# Altium PCB PCB1.PcbDoc
Units mil, origin at the board's own origin, x right, y up, seen from the top; angles counter-clockwise.
Board outline 1505 x 2235 mil, 4 copper layers (Top Layer, In1_GND, In2_GND, Bottom Layer), stack 23.756 mil thick; 69 components, 42 nets, 218 pads, 84 vias.
Unrouted connection lines stored in the file: 3.
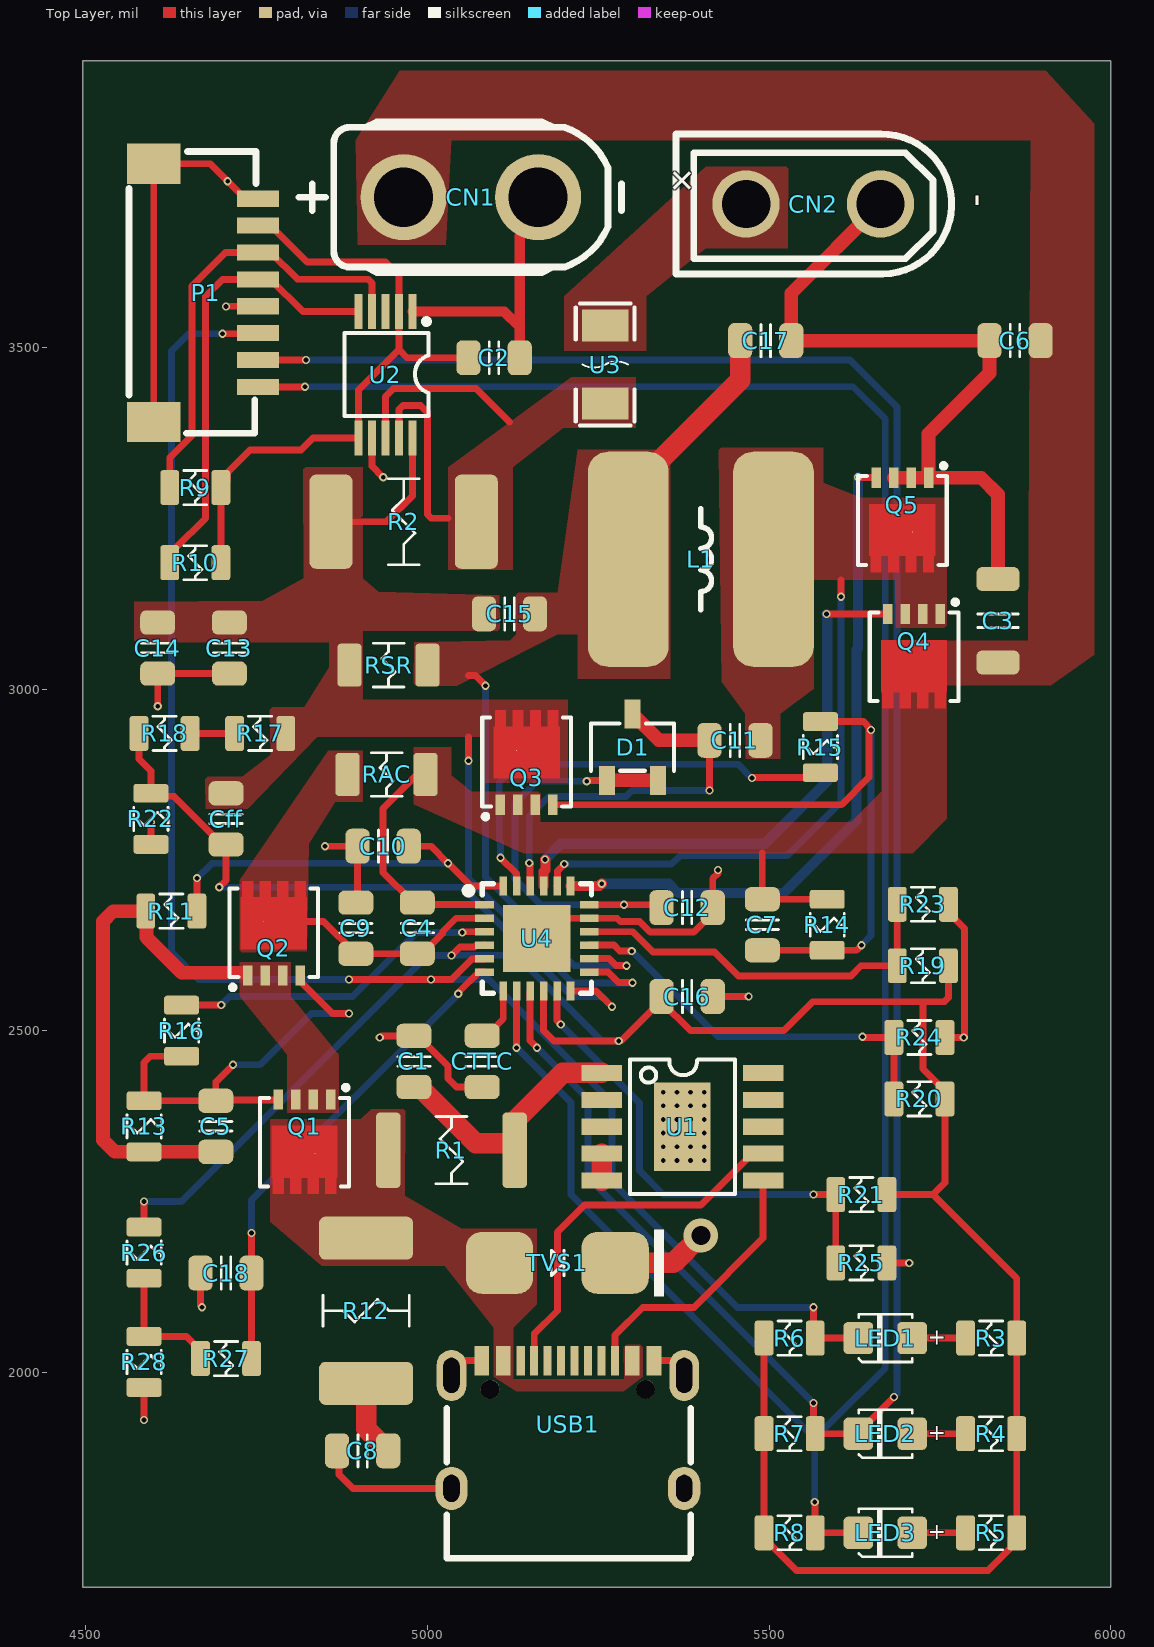
[diagram p0: Top Layer view]
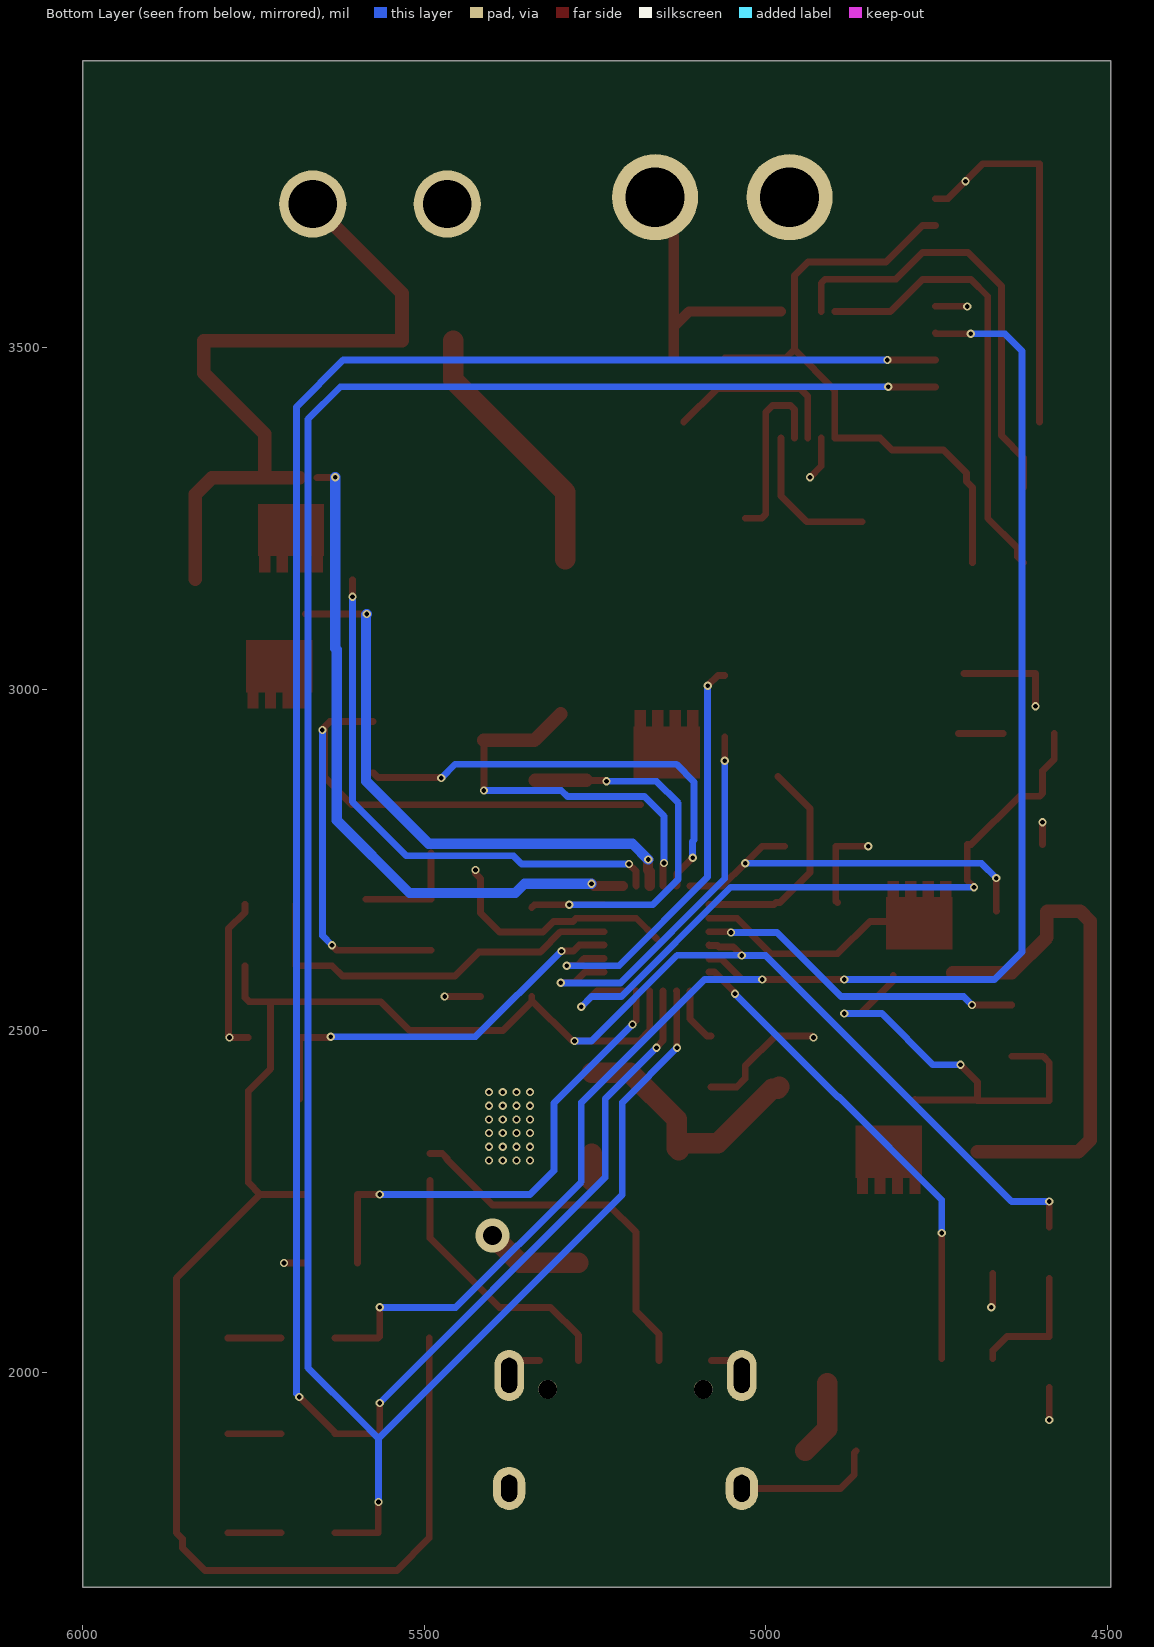
[diagram p1: Bottom Layer view, seen from below]
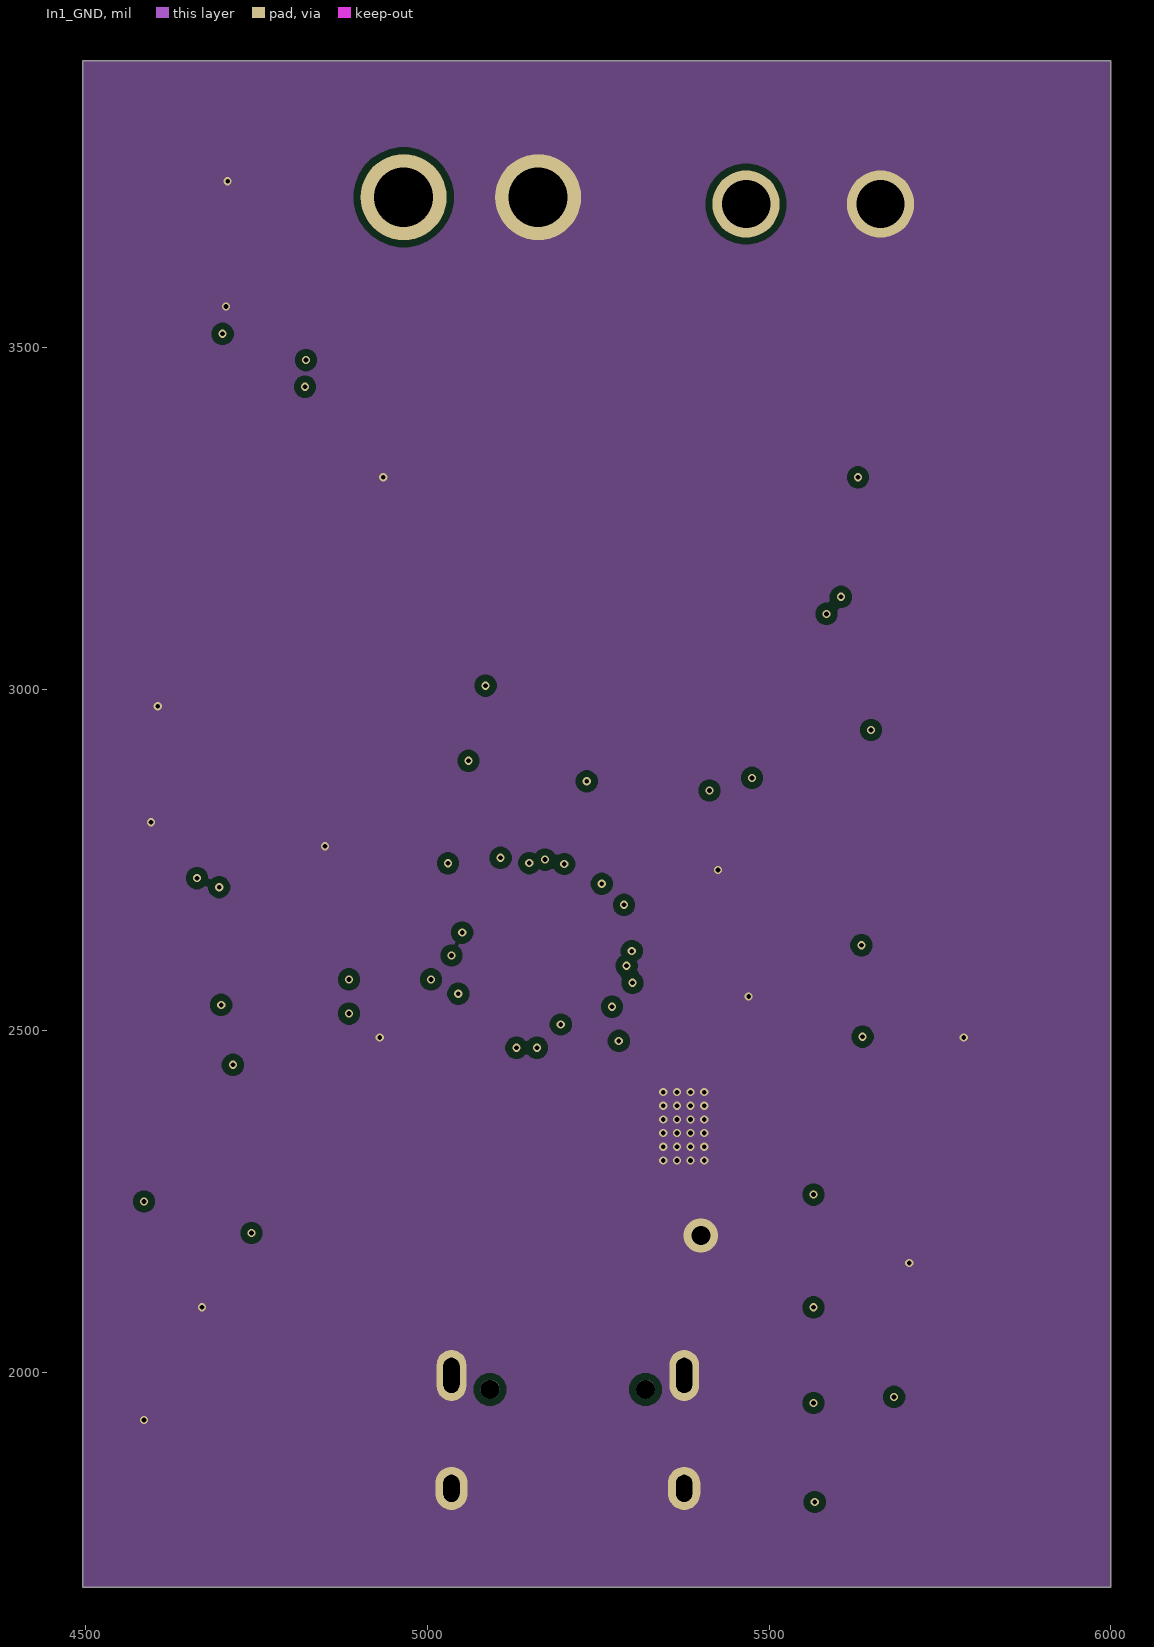
[diagram p2: In1_GND]
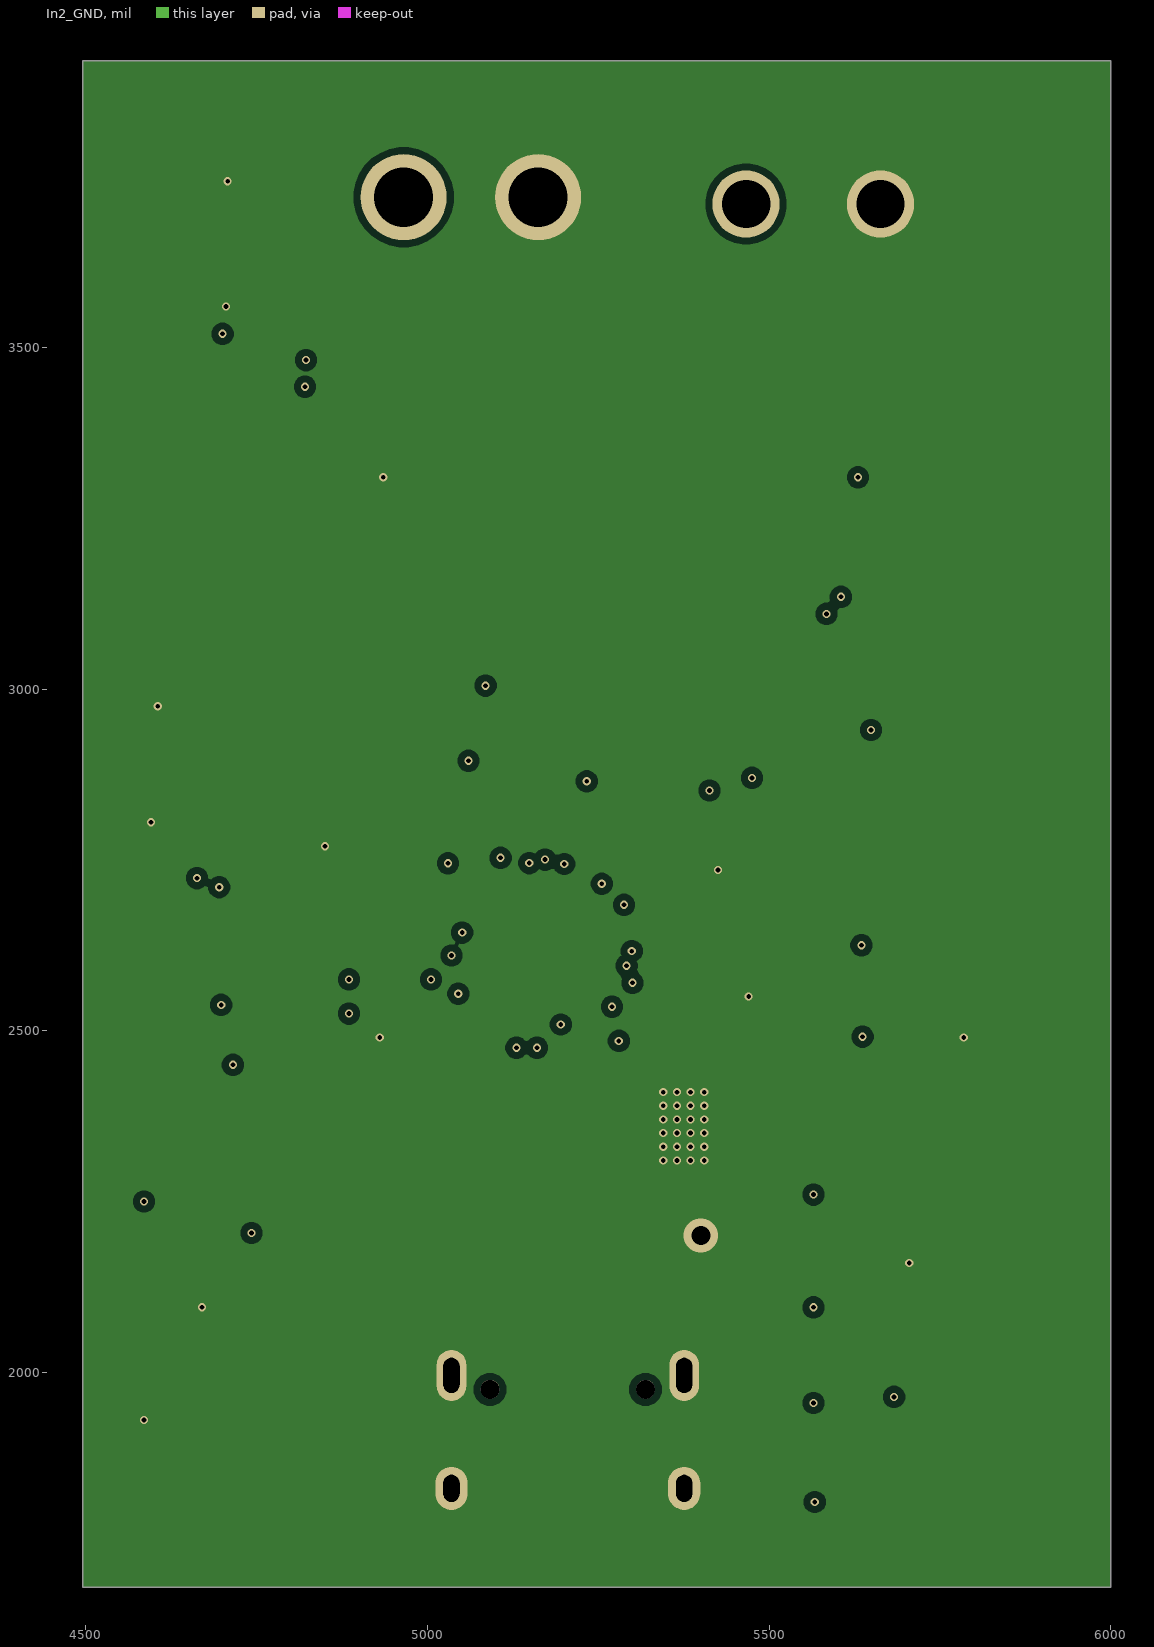
[diagram p3: In2_GND]
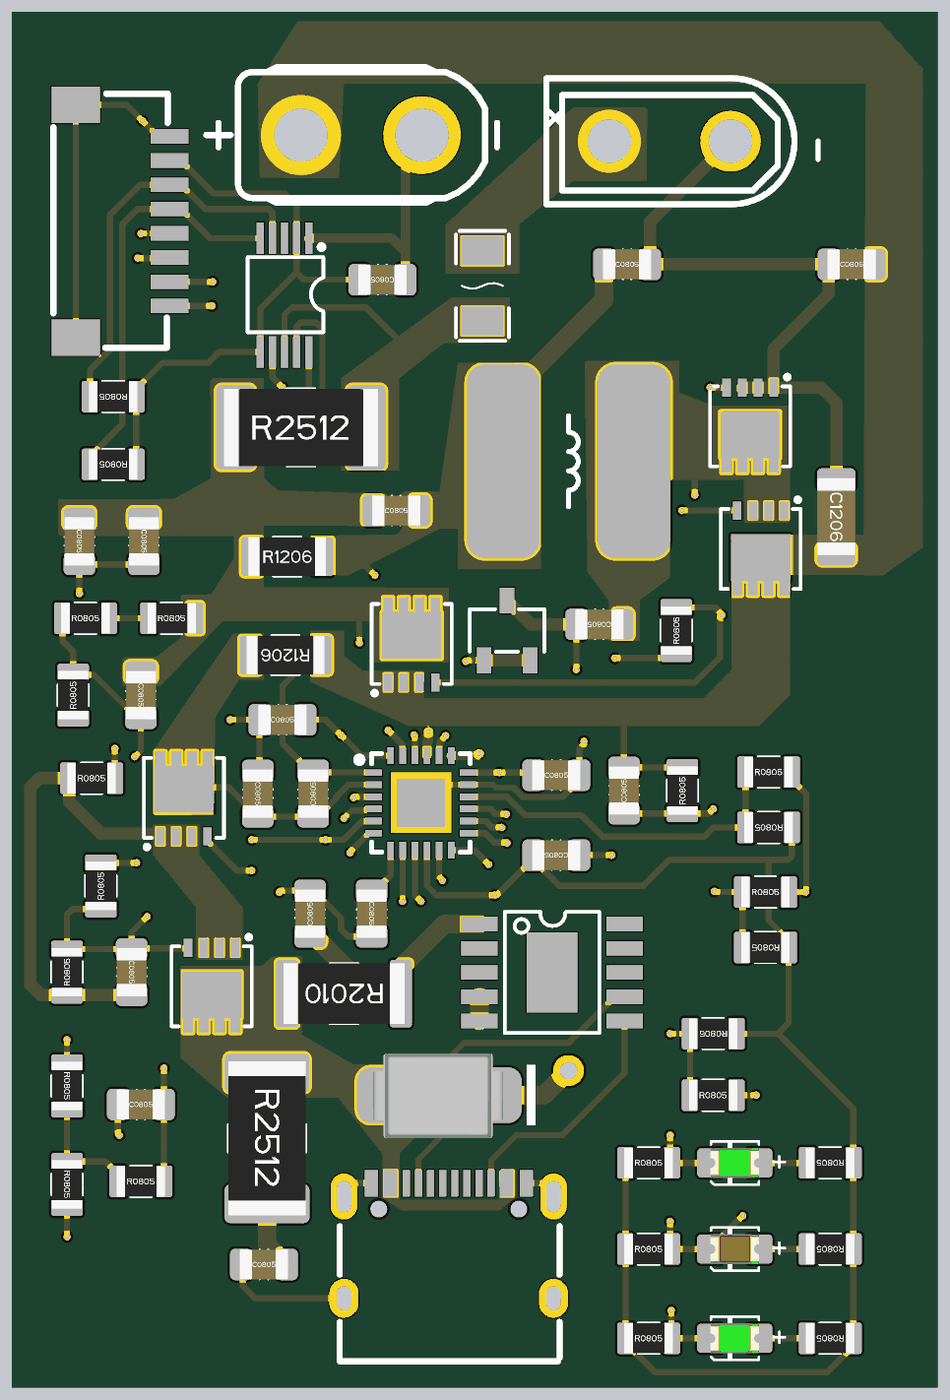
[diagram p4: 3D render of the assembled board from above, using the file's embedded part models]

## Layer stack, top to bottom
Top Solder: solder mask 0.4, Solder Resist, Dk 3.5
Top Layer: signal copper 1.4
Dielectric 2: prepreg 2.8, PP-006, Dk 4.1
In1_GND: signal copper 1.378
Dielectric 1: dielectric 12.6, FR-4, Dk 4.8
In2_GND: signal copper 1.378
Dielectric 3: prepreg 2.8, PP-006, Dk 4.1
Bottom Layer: signal copper 1.4
Bottom Solder: solder mask 0.4, Solder Resist, Dk 3.5

## Board outline
4495,1685 6000,1685 6000,3920 4495,3920

## Design rules (kind name [scope] priority, off if disabled: settings)
Clearance [All] p1: gap=10 ignorepadtopadclearanceinfootprint=FALSE except(0: Arc-THPad Arc-Text Arc-Hole Track-THPad Track-Text Track-Hole SMDPad-SMDPad SMDPad-THPad SMDPad-Via SMDPad-Text SMDPad-Hole THPad-THPad THPad-Via THPad-Text THPad-Hole Via-Via Via-Text Via-Hole Text-Text Text-Hole; 5: Arc-Arc Arc-Track Arc-SMDPad Track-Track Track-SMDPad)
PolygonConnect [All] p1: connectstyle=Direct reliefconductorwidth=10 reliefentries=4 polygonreliefangle="90 Angle" airgapwidth=10
RoutingVias [All] p1: holewidth=28 width=50 viastyle="Through Hole" minholewidth=28 minwidth=50 maxholewidth=28 maxwidth=50
SolderMaskExpansion [All] p1: expansion=4 istentingtop=FALSE
Width [All] p1: maxlimit=10 minlimit=10 preferedwidth=10
30 further rules are at their usual default settings.

## Components (designator, comment, footprint, x,y, rotation, side; value= is the part's Value field where it differs from the comment)
C1 "1uF" CAP-SMD-0805 4980,2455 r90 top value=33pF
C2 "100nF" CAP-SMD-0805 5097.4,3485.01 r180 top value=33pF
C3 "10u" CAP-SMD-1206 5835,3100 r270 top value=33pF
C4 "100nF" CAP-SMD-0805 4985,2650 r90 top value=33pF
C5 "100nF" CAP-SMD-0805 4690,2360 r270 top value=33pF
C6 "10u" CAP-SMD-0805 5860,3510 r0 top value=33pF
C7 "100n" CAP-SMD-0805 5490,2655 r90 top value=33pF
C8 "2.2uF" CAP-SMD-0805 4905,1885 r0 top value=33pF
C9 "100nF" CAP-SMD-0805 4895,2650 r270 top value=33pF
C10 "1uF" CAP-SMD-0805 4935,2770 r0 top value=33pF
C11 "100n" CAP-SMD-0805 5450,2925 r180 top value=33pF
C12 "1u" CAP-SMD-0805 5380,2680 r0 top value=33pF
C13 "10u" CAP-SMD-0805 4709.99,3060 r270 top value=33pF
C14 "10u" CAP-SMD-0805 4605,3060 r270 top value=33pF
C15 "100n" CAP-SMD-0805 5120,3110 r0 top value=33pF
C16 "1uF" CAP-SMD-0805 5380,2550 r180 top value=33pF
C17 "100n" CAP-SMD-0805 5495,3510 r0 top value=33pF
C18 "100nF" CAP-SMD-0805 4705,2145 r0 top value=33pF
Cff "22pF" CAP-SMD-0805 4705,2810 r270 top value=33pF
CN1 "XT30UPB-F" CONN-TH_XT30UPB-F 5047.68,3720.01 r0 top
CN2 "XT30UPB-M" CONN-TH_XT30UPB-M 5585,3710 r180 top
CTTC "470nF" CAP-SMD-0805 5080,2455 r270 top value=33pF
D1 "BAT54C" SOT-23-3_L2.9-W1.6-P1.90-LS2.8-BR 5300,2915 r270 top
L1 "6.8uH" L-SMD-M-8x8mm 5400,3190 r180 top
LED1 "LED" LED-0805-Green 5670,2050 r180 top value="LED 3 - 5 ly 2 Colour"
LED2 "LED" LED-0805-Red 5670,1910 r180 top value="LED 3 - 5 ly 2 Colour"
LED3 "LED" LED-0805-Green 5670,1765 r180 top value="LED 3 - 5 ly 2 Colour"
P1 "SM08B-SRSS-TB(LF)(SN)" CONN-TH_SM08B-SRSS-TB-LF-SN 4670,3580 r270 top
Q1 "SI7617DN(ES)" DFN-8_L3.3-W3.3-P0.65-BL 4820,2340 r180 top
Q2 "SI7617DN(ES)" DFN-8_L3.3-W3.3-P0.65-BL 4775,2640 r0 top
Q3 "SI7617DN(ES)" DFN-8_L3.3-W3.3-P0.65-BL 5145,2890 r0 top
Q4 "SIS412DN-VB" POWERPAK-1212-8_L3.0-W3.0-P0.65-LS3.3-BL 5712.21,3050.57 r180 top
Q5 "SIS412DN-VB" POWERPAK-1212-8_L3.0-W3.0-P0.65-LS3.3-BL 5695,3250 r180 top
R1 "1k" RES-SMD-2010 5035,2325 r180 top
R2 "3m" RES-SMD-2512 4965,3245 r0 top
R3 "680" RES-SMD-0805 5825,2050 r180 top
R4 "680" RES-SMD-0805 5825,1910 r180 top
R5 "680" RES-SMD-0805 5825,1765 r180 top
R6 "10k" RES-SMD-0805 5530,2050 r0 top
R7 "10k" RES-SMD-0805 5530,1910 r0 top
R8 "10k" RES-SMD-0805 5530,1765 r0 top
R9 "10k" RES-SMD-0805 4660,3295 r180 top
R10 "10k" RES-SMD-0805 4660,3185 r180 top
R11 "10" RES-SMD-0805 4625,2675 r0 top
R12 "2" RES-SMD-2512 4910,2090 r270 top
R13 "100k" RES-SMD-0805 4585,2360 r90 top
R14 "100k" RES-SMD-0805 5585,2655 r90 top
R15 "1k" RES-SMD-0805 5575,2915 r90 top
R16 "1k" RES-SMD-0805 4640,2500 r90 top
R17 "200k" RES-SMD-0805 4755,2935 r0 top
R18 "500k" RES-SMD-0805 4615,2935 r0 top
R19 "100k" RES-SMD-0805 5725,2595 r180 top
R20 "100k" RES-SMD-0805 5720,2400 r180 top
R21 "100k" RES-SMD-0805 5635,2260 r180 top
R22 "100k" RES-SMD-0805 4595,2810 r90 top
R23 "22k" RES-SMD-0805 5725,2685 r0 top
R24 "10k" RES-SMD-0805 5720,2490 r0 top
R25 "27k" RES-SMD-0805 5635,2160 r0 top
R26 "10k" RES-SMD-0805 4585,2175 r270 top
R27 "100" RES-SMD-0805 4705,2020 r0 top
R28 "15k" RES-SMD-0805 4585,2015 r270 top
RAC "10m" RES-SMD-1206 4940,2875 r180 top
RSR "10m" RES-SMD-1206 4942.91,3035 r0 top
TVS1 "DIODE TVS" SMB 5190,2160 r0 top
U1 "CH224K" ESSOP-10_L4.9-W3.9-P1.0-LS6.0-TL-EP 5368.97,2359.37 r270 top
U2 "INA228AQDGSRQ1" VSSOP-10_L3.0-W3.0-P0.50-LS4.9-BL 4940,3460 r180 top
U3 "0501020.WR1" F1206 5260,3475 r90 top
U4 "BQ24630RGER" QFN-24_L4.0-W4.0-P0.50-BL-EP2.5 5152.78,2635 r270 top
USB1 "TYPE-C 16PIN 2MD(073)" USB-C-SMD_TYPE-C-16PIN-2MD-073 5205.28,1880.65 r0 top

## Footprints (in the part's own frame and the unit in brackets; to place one, negate y for a bottom-side part, rotate by r counter-clockwise, add the part's x,y. Pads: shape width x height; smd on the part's side, far side on the other; paste and mask are expansions set on the pad)
CAP-SMD-0805 [mm]
  rrect50% 0.9x1.3 smd: 1(-0.95,0) 2(0.95,0)
  silkscreen extent -0.18,-0.6 0.18,0.6, body extent -1,-0.63 1,0.63, height 1.27
CAP-SMD-1206 [mm]
  rrect50% 0.9x1.6 smd: 1(-1.55,0) 2(1.55,0)
  silkscreen extent -0.25,-0.75 0.25,0.75, body extent -1.6,-0.8 1.6,0.8, height 1.78
CONN-TH_SM08B-SRSS-TB-LF-SN [mm]
  rect 0.6x1.55 smd paste+0 mask+0.051: 1(-3.5,2.074) 2(-2.502,2.074) 3(-1.502,2.074) 4(-0.502,2.074) 5(0.5,2.074) 6(1.498,2.074) 7(2.498,2.074) 8(3.5,2.074)
  rect 1.5x2 smd paste+0 mask+0.051: 9(4.8,-1.801) 10(-4.8,-1.801)
  silkscreen extent -5.26,-2.72 5.22,2
CONN-TH_XT30UPB-F [mm]
  round 3.2 hole 2.2 paste-2539.97 mask+0.051: 1(-2.1,0) 2(2.9,0)
  silkscreen extent -6,-2.8 6,2.8
CONN-TH_XT30UPB-M [mm]
  round 2.5 hole 1.8 paste-2539.97 mask+0.051: 1(-1.982,0) 2(3.018,0)
  silkscreen extent -4.63,-2.6 5.62,2.6
DFN-8_L3.3-W3.3-P0.65-BL [mm]
  rect 0.35x0.75 smd paste+0 mask+0.05: 1(-0.975,-1.509) 2(-0.325,-1.509) 3(0.325,-1.509) 4(0.975,-1.509)
  round 0.025 smd: 5(-0.381,0.508)
  Top Layer region: -1.222,-0.529 -1.222,1.399 -1.174,1.399 -1.174,2 -0.773,2 -0.773,1.399 -0.524,1.399 -0.524,2 -0.122,2 -0.122,1.399 0.126,1.399 0.126,2 0.528,2 0.528,1.399 0.777,1.399 0.777,2 0.777,1.399 0.777,2 1.178,2 1.178,1.399 1.226,1.399 1.226,-0.529
  silkscreen extent -1.65,-2 1.65,1.73
ESSOP-10_L4.9-W3.9-P1.0-LS6.0-TL-EP [mm]
  rect 0.6x1.5 smd paste+0 mask+0.05: 1(-2,-2.895) 2(-1,-2.895) 3(0,-2.895) 4(1,-2.895) 5(2,-2.895) 6(2,3.105) 7(1,3.105) 8(0,3.105) 9(-1,3.105) 10(-2,3.105)
  rect 3.3x2.1 smd paste+0 mask+0.05: 11(0,0.105)
  silkscreen extent -2.5,-1.84 2.5,2.06
F1206 [mil]
  rect 46.85x68.03 smd paste+0 mask+2: 1(-56.89,0) 2(56.89,0)
  silkscreen extent -89,-43 89,43
L-SMD-M-8x8mm [mm] "8x8mm"
  rrect50% 3x8 smd: 1(-2.7,0) 2(2.7,0)
  silkscreen extent -0.4,-1.87 0,1.87, body extent -3,-3 3,3, height 2
LED-0805-Green [mm]
  rrect30% 1.1x1.2 smd: 1(-1,0) 2(1,0)
  silkscreen extent -1,-0.89 0.99,0.89, body extent -1.01,-0.62 1.01,0.63, height 1.1
LED-0805-Red [mm]
  rrect30% 1.1x1.2 smd: 1(-1,0) 2(1,0)
  silkscreen extent -1,-0.89 0.99,0.89, body extent -1.01,-0.63 1.01,0.63, height 1.1
POWERPAK-1212-8_L3.0-W3.0-P0.65-LS3.3-BL [mm]
  rect 0.35x0.75 smd paste+0 mask+0.05: 1(-0.975,-1.509) 2(-0.325,-1.509) 3(0.325,-1.509) 4(0.975,-1.509)
  round 0.025 smd: 5(-0.381,0.508)
  Top Layer region: -1.222,-0.529 -1.222,1.399 -1.174,1.399 -1.174,2 -0.773,2 -0.773,1.399 -0.524,1.399 -0.524,2 -0.122,2 -0.122,1.399 0.126,1.399 0.126,2 0.528,2 0.528,1.399 0.777,1.399 0.777,2 0.777,1.399 0.777,2 1.178,2 1.178,1.399 1.226,1.399 1.226,-0.529
  silkscreen extent -1.65,-2 1.65,1.73
QFN-24_L4.0-W4.0-P0.50-BL-EP2.5 [mm]
  rect 0.28x0.7 smd paste-100 mask+0.05: 1(-1.25,-1.767) 2(-0.75,-1.767) 3(-0.25,-1.767) 4(0.25,-1.767) 5(0.75,-1.767) 6(1.25,-1.767) 13(1.25,2.134) 14(0.75,2.134) 15(0.25,2.134) 16(-0.25,2.134) 17(-0.75,2.134) 18(-1.25,2.134)
  rect 0.7x0.28 smd paste-100 mask+0.05: 7(1.95,-1.067) 8(1.95,-0.567) 9(1.95,-0.067) 10(1.95,0.433) 11(1.95,0.933) 12(1.95,1.433) 19(-1.95,1.433) 20(-1.95,0.933) 21(-1.95,0.433) 22(-1.95,-0.067) 23(-1.95,-0.567) 24(-1.95,-1.067)
  rect 2.5x2.5 smd paste-100 mask+0.05: 25(0,0.183)
  silkscreen extent -2.03,-2.48 2.03,2.22
RES-SMD-0805 [mm]
  rrect30% 0.7x1.3 smd: 1(-0.95,0) 2(0.95,0)
  silkscreen extent -0.43,-0.64 0.43,0.64, body extent -1,-0.63 1,0.63, height 0.6
RES-SMD-1206 [mm]
  rrect30% 0.9x1.6 smd: 1(-1.45,0) 2(1.45,0)
  silkscreen extent -0.58,-0.81 0.58,0.81, body extent -1.6,-0.8 1.6,0.8, height 0.6
RES-SMD-2010 [mm] "Chip Capacitor, Body 3.2x2.5mm, IPC Medium Density"
  rrect30% 0.9x2.8 smd: 1(-2.35,0) 2(2.35,0)
  silkscreen extent -0.58,-1.25 0.58,1.25, body extent -2.5,-1.25 2.5,1.25, height 0.55
RES-SMD-2512 [mm] "Chip Capacitor, Body 3.2x2.5mm, IPC Medium Density"
  rrect30% 1.6x3.5 smd: 1(-2.7,0) 2(2.7,0)
  silkscreen extent -0.57,-1.6 0.58,1.6, body extent -3.17,-1.6 3.17,1.6, height 0.55
SMB [mm]
  rrect50% 2.5x2.3 smd: 1(-2.15,0) 2(2.15,0)
  silkscreen extent -0.23,-1.25 3.97,1.25, body extent -2.73,-1.77 2.63,1.73, height 2.31
SOT-23-3_L2.9-W1.6-P1.90-LS2.8-BR [mm]
  rect 1.07x0.6 smd paste+0 mask+0.051: 1(1.235,-0.95) 2(1.235,0.95) 3(-1.235,0)
  silkscreen extent -0.88,-1.54 0.88,1.54
USB-C-SMD_TYPE-C-16PIN-2MD-073 [mm]
  oval 1.2x1.6 hole 0.6 slot 1 at 90 deg paste-2539.97 mask+0.05: 13(-4.325,-1.286) 14(4.325,-1.286)
  oval 1.1x1.9 hole 0.6 slot 1.3 at 90 deg paste-2539.97 mask+0.05: 13(-4.325,2.914) 14(4.325,2.913)
  rect 0.55x1.1 smd paste+0 mask+0.05: A1B12(-3.2,3.463) A4B9(-2.4,3.463) B1A12(3.2,3.463) B4A9(2.4,3.463)
  rect 0.3x1.1 smd paste+0 mask+0.05: A5(-1.25,3.463) A6(-0.25,3.463) A7(0.25,3.463) A8(1.25,3.463) B5(1.75,3.463) B6(0.75,3.463) B7(-0.75,3.463) B8(-1.75,3.463)
  round 0.7 hole 0.7 unplated paste-2539.97: ""(-2.89,2.393) ""(2.89,2.393)
  silkscreen extent -4.5,-3.89 4.57,1.69
VSSOP-10_L3.0-W3.0-P0.50-LS4.9-BL [mm]
  rect 0.3x1.3 smd paste+0 mask+0.051: 1(-0.959,-2.35) 2(-0.459,-2.35) 3(0.04,-2.35) 4(0.541,-2.35) 5(1.041,-2.35) 6(1.04,2.35) 7(0.541,2.35) 8(0.041,2.35) 9(-0.459,2.35) 10(-0.96,2.35)
  silkscreen extent -1.58,-2.08 1.56,1.54

## Part data
C1 C2 C3 C4 C5 C6 C7 C8 C9 C10 C11 C12 C13 C14 C15 C16 C17 C18 Cff CTTC: library part CAP-SMD
L1: library part L-SMD-1, Inductance="1.0 μH", Manufacturer="Wurth Elektronik", partNo=78477010, ComponentLink1Description=Manufacturer, ComponentLink1URL=http://www.we-online.de, ComponentLink2Description=Datasheet, ComponentLink2URL=http://katalog.we-online.de/pbs/datasheet/78477010.pdf, Created by="Baojun Chen", Created Date=Nov.2015
LED1 LED2 LED3: library part LED1-SMD
R1 R2 R3 R4 R5 R6 R7 R8 R9 R10 R11 R12 R13 R14 R15 R16 R17 R18 R19 R20 R21 R22 R23 R24 R25 R26 R27 R28 RAC RSR: library part Res-SMD, "Resistor", Manufacturer="Generic Components", Class=Passive, Published=08/06/2000, Publisher="Altium Hobart Technology Centre"
TVS1: "TVS"

## Via types
v1: diameter 12, hole 7, Top Layer to Bottom Layer, 83 vias
v2: diameter 50, hole 28, Top Layer to Bottom Layer, 1 vias

## Nets (pads, with @x,y where several pads share a name; then routed paths per layer and width w, separated by ;. In a path a pad name is that pad's centre, name@x,y a point inside that pad or via, vN(x,y) a via of type N, cw(c..) or ccw(c..) an arc to the next point about the centre after c; other vN are vias at no path point)
+3V3: C2.2 P1.2 R9.1 R10.1 U2.2 U2.6 | length 954.7
  Top Layer w10: R10.1 R9.1 4706.18,3303.78 4706.18,3316.18 4740,3350 4815,3350 4832.48,3367.47 U2.6 4899.04,3437.86 4958.09,3496.91 ; P1.2 4770.37,3678.5 4823.87,3625 4938.28,3625 4958.09,3605.19 U2.2 4958.09,3496.91 ; C2.2 4970,3485 4958.09,3496.91
ACSET: R19.2 R23.1 U4.16 | length 573.9
  Top Layer w10: U4.16 5300.16,2644.84 5330,2615 5420,2615 5455,2580 5619.7,2580 5634.7,2595 R19.2 R23.1
GND: C1.2 C2.1 C3.1 C6.1 C8.1 C9.1 C10.1 C12.2 C13.2 C14.2 C16.1 C17.2 C18.1 CN1.2 CN2.1 CTTC.2 P1.1 P1.5 P1.9 P1.10 Q5.1 Q5.2 Q5.3 R22.1 R23.2 R24.2 R25.2 R28.2 TVS1.2 U1.11 U2.1 U2.7 U4.17 U4.25 USB1.13 USB1.14 USB1.A1B12 USB1.B1A12 | length 3889.7
  Top Layer w10: v1(4585,1930) R28.2 ; R22.1 v1(4595,2805) ; P1.9 P1.10 4681.78,3768.98 v1(4707.37,3743.39) 4732.97,3717.79 P1.1 ; v1(4605,2975) C14.2 C13.2 ; C18.1 4667.6,2097.4 v1(4670,2095) ; v1(4705,3560) 4705.31,3560.31 P1.5 ; v1(4850,2770) C10.1 4897.6,2689.99 C9.1 ; C8.1 4870.37,1882.23 4870.37,1850.27 4890.64,1830 USB1.13@5035,1830 ; U2.7 4918.72,3326.28 v1(4935,3310) ; v1(4930,2490) 4932.4,2492.4 C1.2 4985.78,2492.4 5030,2448.18 5030,2430 5042.4,2417.6 CTTC.2 ; USB1.13@5035,1995.36 5035,2001.62 5050.39,2017.01 USB1.A1B12 ; U4.25 5189.52,2664.52 U4.17 5277.58,2664.52 5282.26,2659.84 5310.5,2659.84 5325.93,2644.42 5389.69,2644.42 5417.4,2672.13 C12.2 5417.4,2722.4 5425,2730 v1(5425,2735) ; USB1.B1A12 5360.17,2017.01 5375.55,2001.62 USB1.14@5375.55,1995.35 ; C16.1 v1(5469.99,2549.99) ; R25.2 v1(5705,2160) ; R24.2 v1(5785,2490) 5785,2490.54 5786.18,2491.72 5786.18,2649.41 5762.4,2673.19 R23.2
  Top Layer w15: U2.1 5112.48,3552.51 5134.8,3530.2 ; C2.1 5134.8,3530.2 ; CN1.2 5161.85,3689.97 5134.8,3662.92 5134.8,3530.2
  Top Layer w20: CN2.1 5532.4,3579.35 C17.2 C6.1 5822.6,3462.6 5733.38,3373.38 Q5.1 ; Q5.3 Q5.2 Q5.1 ; C3.1 5835,3285 5810.57,3309.43 Q5.1
  Top Layer w30: TVS1.2 5360,2160 v2(5400,2200)
  other v1: 5345,2310 5365,2310 5385,2310 5405,2310 5345,2330 5365,2330 5385,2330 5405,2330 5345,2350 5365,2350 5385,2350 5405,2350 5345,2370 5365,2370 5385,2370 5405,2370 5345,2390 5365,2390 5385,2390 5405,2390 5345,2410 5365,2410 5385,2410 5405,2410
ISET1: R21.2 R25.1 U4.11 | length 715.2
  Top Layer w10: U4.11 5189.53,2515.01 5195,2509.54 v1(5195,2509) ; v1(5565,2260) R21.2 R25.1
  Bottom Layer w10: v1(5195,2509) 5310,2394 5310,2295 5345,2260 v1(5565,2260)
ISET2: R20.2 R24.1 U4.15 | length 591.8
  Top Layer w10: U4.15 5272.92,2625.15 5281.31,2616.77 5298.54,2616.77 v1(5298.92,2616.38) ; v1(5636.8,2491.15) 5637.34,2491.15 5638.5,2490 R24.1 R20.2
  Bottom Layer w10: v1(5298.92,2616.38) 5299.3,2616 5300,2616 5424.85,2491.15 v1(5636.8,2491.15)
NetC1_1: C1.1 R1.1 U1.1 | length 389.4
  Top Layer w30: C1.1 4982.71,2414.88 4990.58,2414.88 5070.47,2335 5124.8,2335 5127.52,2332.28 R1.1 5130.24,2327.72 5130.24,2370.24 5198.11,2438.11 U1.1
NetC4_1: C4.1 C9.2 Q2.5 RAC.2 U4.2 | length 366
  Top Layer w10: Q2.5 4847.6,2660 C9.2 4992.87,2612.6 5022.18,2641.91 5022.18,2644.76 5041.94,2664.52 U4.2
NetC5_1: C5.1 Q1.4 Q2.4 R13.2 R16.1 | length 701
  Top Layer w10: 4622.4,2397.4 R13.2@4596.81,2397.4 ; R16.1 4594.46,2462.6 4585,2453.14 R13.2 R13.2@4596.81,2397.4 ; v1(4715,2450) 4690.01,2425.01 C5.1 ; Q1.4 4780.6,2398.41 4691.02,2398.41 C5.1 ; Q2.4 4813.39,2572.7 4861.09,2525 v1(4885,2525) ; R13.2@4596.81,2397.4 C5.1
  Bottom Layer w10: v1(4715,2450) 4755,2450 4830,2525 v1(4885,2525)
NetC5_2: C5.2 Q1.1 Q1.2 Q1.3 Q2.1 Q2.2 Q2.3 R11.1 R13.1 | length 758.9
  Top Layer w20: C5.2 R13.1 4542.4,2322.6 4525,2340 4525,2660 4540,2675 R11.1 4588.49,2674.11 4588.49,2636.51 4640,2585 4726.18,2585
NetC7_1: C7.1 Q3.4 R14.1 R15.2 | length 1097.2
  Top Layer w10: Q3.4 5605.57,2830.57 5646,2871 v1@5646,2940 ; C7.1 R14.1 5627.6,2617.6 v1(5635,2625) ; R15.2 5638.06,2952.4 5648.62,2941.84 5648.62,2940.38 v1(5649,2940)
  Bottom Layer w10: v1(5635,2625) 5649,2639 v1(5649,2940)
NetC8_2: C8.2 R12.2 | length 112.1
  Top Layer w30: R12.2 4910,1917.41 C8.2
NetC10_2: C10.2 R11.2 U4.24 | length 587.3
  Top Layer w10: R11.2 4662.49,2675.09 4662.49,2723.15 v1(4662.58,2723.24) ; C10.2 5004.99,2770.01 v1(5030,2745) 5030.54,2745 5063.77,2711.77 U4.24
  Bottom Layer w10: v1(4662.58,2723.24) 4684.34,2745 v1(5030,2745)
NetC11_1: C11.1 L1.1 Q4.1 Q4.2 Q4.3 Q5.5 U4.20 | length 804.2
  Top Layer w10: U4.20 5190.04,2712.28 5190.04,2733.46 5200,2743.42 v1(5200,2743.96) ; v1(5605,3135) 5605,3160
  Bottom Layer w10: v1(5200,2743.96) 5357.25,2743.96 5369.29,2756 5526,2756 5605,2835 v1(5605,3135)
NetC11_2: C11.2 D1.3 U4.22 | length 583.9
  Top Layer w10: v1(5148.96,2745.21) 5148.96,2744.67 5150.16,2743.47 U4.22 ; v1(5412.6,2851.57) C11.2
  Top Layer w20: D1.3 5338.63,2924.99 C11.2
  Bottom Layer w10: v1(5148.96,2745.21) 5148.96,2813.96 5177.57,2842.57 5290.32,2842.57 5299.32,2851.57 v1(5412.6,2851.57)
NetC12_1: C12.1 D1.1 D1.2 U4.18 | length 617.1
  Top Layer w10: v1(5233.04,2865) 5233.58,2865 5234.96,2866.38 D1.1 ; U4.18 v1(5287.59,2684.21) 5338.39,2684.21 C12.1
  Top Layer w20: D1.1 D1.2
  Bottom Layer w10: v1(5233.04,2865) 5160,2865 5127.96,2832.96 5127.96,2722.04 5165.79,2684.21 v1(5287.59,2684.21)
NetC15_2: C15.2 C17.1 L1.2 RSR.2 U4.14 | length 1018.1
  Top Layer w10: 5060,3020 5070,3020 v1(5085,3005) ; U4.14 5265.74,2605.47 5275.83,2595.38 5290.92,2595.38 v1(5291.3,2595)
  Top Layer w30: L1.2 5293.7,3288.42 5457.6,3452.32 C17.1
  Bottom Layer w10: v1(5085,3005) 5085,2725 5215,2595 v1(5291.3,2595)
NetCff_2: Cff.2 R18.1 R22.2 U4.12 | length 1020.4
  Top Layer w10: R18.1 4577.6,2897.79 4595,2880.39 R22.2 4599.37,2843.03 4628.79,2843.03 4699.22,2772.6 Cff.2 4705.01,2720.01 v1(4695,2710) ; U4.12 5246.78,2558.22 v1(5270,2535)
  Bottom Layer w10: v1(4695,2710) 5051.21,2710 5211.21,2550 5255,2550 v1(5270,2535)
NetCN2_2: CN2.2 U3.2
NetCTTC_1: CTTC.1 U4.7 | length 82
  Top Layer w10: CTTC.1 5085.79,2492.4 5110.79,2517.4 U4.7
NetLED1_1: LED1.1 R3.2 | length 78.2
  Top Layer w10: LED1.1 R3.2
NetLED2_1: LED2.1 R4.2 | length 78.2
  Top Layer w10: LED2.1 R4.2
NetLED3_1: LED3.1 R5.2 | length 78.2
  Top Layer w10: LED3.1 R5.2
NetQ4_4: Q4.4 U4.21 | length 836.1
  Top Layer w10: v1(5584,3110) Q4.4
  Top Layer w15: U4.21 5169.84,2732.85 5172.46,2735.47 5172.46,2750.43 v1(5171.87,2750.43)
  Bottom Layer w15: v1(5171.87,2750.43) 5194.94,2773.5 5493.5,2773.5 5585,2865 5585,3109 v1(5584,3110)
NetQ5_4: Q5.4 U4.19 | length 999.5
  Top Layer w10: v1(5630,3310) 5630.29,3309.71 5656.32,3309.71 Q5.4
  Top Layer w15: U4.19 5251.23,2711.77 5254.46,2715 v1(5255,2715)
  Bottom Layer w15: v1(5255,2715) 5353.12,2715 5366.62,2701.5 5521.5,2701.5 5628,2808 5628,3057.73 5630,3059.73 v1(5630,3310)
NetR15_1: R15.1 U4.23 | length 655.1
  Top Layer w10: v1(5106.96,2752.96) 5129.96,2729.96 5129.96,2712.28 U4.23 ; v1(5475,2870) 5475.38,2870.38 5567.78,2870.38 R15.1
  Bottom Layer w10: v1(5106.96,2752.96) 5106.96,2777 5105,2778.96 5105,2864.14 5130.86,2890 5454.46,2890 5474.46,2870 v1(5475,2870)
NetR16_2: R16.2 U4.3 | length 487.7
  Top Layer w10: R16.2 4640.16,2537.56 4697.72,2537.56 v1(4697.88,2537.71) ; v1(5050.64,2643.52) 5051.18,2643.52 5052.5,2644.84 U4.3
  Bottom Layer w10: v1(4697.88,2537.71) 4710.16,2550 4890,2550 4983.52,2643.52 v1(5050.64,2643.52)
NetR17_1: R17.1 R18.2 | length 65.2
  Top Layer w10: R18.2 R17.1
NetR26_2: R26.2 R27.1 R28.1 | length 188.1
  Top Layer w10: R26.2 R28.1 4647.01,2052.4 4667.6,2031.81 R27.1
NetU1_4: U1.4 U1.5 | length 39.4
  Top Layer w30: U1.5 U1.4
NetU1_6: U1.6 USB1.B5 | length 397.5
  Top Layer w10: USB1.B5 5274.17,2054.17 5315,2095 5390,2095 5491.22,2196.22 U1.6
NetU1_7: U1.7 USB1.A5 | length 551.8
  Top Layer w10: USB1.A5 5156.06,2056.06 5190,2090 5190,2205 5230,2245 5400,2245 5466.69,2311.69 5466.69,2313.19 5473.5,2320 U1.7
PG: LED3.2 P1.8 R8.2 U4.8 | length 3510.5
  Top Layer w10: P1.8 4751.83,3442.37 4820.37,3442.37 v1(4820.53,3442.54) ; v1(5130,2475) 5130.23,2475.23 5130.23,2557.99 U4.8 ; v1(5566.77,1810.11) 5567.09,1809.8 5567.09,1765.31 R8.2 LED3.2
  Bottom Layer w10: v1(4820.53,3442.54) 5622.46,3442.54 5670,3395 5670,2006.45 5595,1931.45 5566.77,1903.23 ; v1(5130,2475) 5210,2395 5210,2260 5566.77,1903.23 ; v1(5566.77,1810.11) 5566.77,1903.23
SCL: P1.4 R10.2 U2.5 | length 665.6
  Top Layer w10: R10.2 4631.38,3193.78 4631.38,3206.38 4675,3250 4675,3575 4699.76,3599.76 4770.37,3599.76 4817.61,3552.51 U2.5
SDA: P1.3 R9.2 U2.4 | length 652.7
  Top Layer w10: R9.2 4622.6,3338.54 4655,3370.94 4655,3590 4704.13,3639.13 4770.37,3639.13 4809.5,3600 4912.86,3600 4918.72,3594.14 U2.4
STAT1: LED1.2 P1.6 R6.2 U4.5 | length 2440.8
  Top Layer w10: v1(4700,3520) 4750.65,3520 P1.6 ; v1(4885,2575) v1(5005,2575) 5035,2575 5064.96,2604.96 5082.72,2604.96 U4.5 ; v1(5565,2095) 5565,2052.4 R6.2 LED1.2
  Bottom Layer w10: v1(4700,3520) 4650,3520 4625,3495 4625,2615 4665,2575 v1(4885,2575) ; v1(5005,2575) 5089.7,2575 5270,2394.7 5270,2278.79 5453.79,2095 v1(5565,2095)
STAT2: LED2.2 P1.7 R7.2 U4.9 | length 3374.5
  Top Layer w10: P1.7 P1.7 4821.89,3481.57 v1(4821.97,3481.49) ; U4.9 5150.16,2485.38 5160,2475.54 v1(5160,2475) ; v1(5565,1955) 5565,1912.4 R7.2 LED2.2 5630.63,1911.8 5682.77,1963.94 v1(5682.94,1963.94)
  Bottom Layer w10: v1(4821.97,3481.49) 5618.51,3481.49 5687,3413 5687,1968.54 5682.94,1964.48 v1(5682.94,1963.94) ; v1(5160,2475) 5235,2400 5235,2285 v1(5565,1955)
TS: C18.2 R27.2 U4.6 | length 712.4
  Top Layer w10: C18.2 v1@4742.37,2203.86 ; R27.2 C18.2 ; v1(5045,2554) 5045.38,2554.38 5045.38,2556.2 5074.96,2585.78 U4.6
  Bottom Layer w10: v1(4742.34,2203.89) 4742.34,2252.34 4892.98,2402.98 4893.98,2402.98 v1(5045,2554)
VBAT: C13.1 C14.1 C15.1 Cff.1 Q3.5 R2.1 R17.2 RSR.1 U2.10 U4.13 | length 799.9
  Top Layer w10: R2.1 4940,3245 4977.78,3282.78 U2.10 ; v1(5060,2895) 5060,2930 ; U4.13 5264.22,2585.78 5279.62,2570.38 5299.62,2570.38 v1(5300,2570)
  Bottom Layer w10: v1(5060,2895) 5060,2722.43 5212.43,2570 v1(5300,2570)
VBAT_IN: R2.2 U2.8 U2.9 U3.1 | length 539.5
  Top Layer w10: U2.8 4938.4,3428.4 4950,3440 5070.86,3440 5120.04,3390.82 ; U2.9 4958.09,3409.14 4963.95,3415 4990,3415 5000,3405 5000,3255.86 5005.86,3250 5030,3250
VREF: C16.2 R3.1 R4.1 R5.1 R6.1 R7.1 R8.1 R19.1 R20.1 R21.1 R26.1 U4.4 U4.10 | length 3388.7
  Top Layer w10: R26.1 v1(4585,2250) ; v1(5035,2610) 5047.52,2622.52 5068.59,2622.52 5070.71,2624.64 5082.72,2624.64 U4.4 ; U4.10 5169.84,2500.16 5185,2485 v1@5280.54,2485 ; v1(5280,2485) 5280.38,2485.38 5283.77,2485.38 5342.6,2544.21 C16.2 ; C16.2@5342.6,2542.12 5384.72,2500 5521.5,2500 5563.9,2542.4 5725,2542.4 ; R6.1 R7.1 R8.1 5492.6,1757.32 5539.92,1710 5820.66,1710 5853.62,1742.96 5853.62,1756.22 R5.1 R4.1 R3.1 5862.4,2137.6 5740,2260 ; R21.1 5740,2260 ; R19.1 5762.4,2548.26 5756.54,2542.4 5725,2542.4 ; 5725,2542.4 5725,2444.21 5757.4,2411.81 R20.1 5757.4,2277.4 5740,2260
  Bottom Layer w10: v1(4585,2250) 4640,2250 5000,2610 v1(5035,2610) ; v1@5035.38,2610.38 5129.62,2610.38 5255,2485 v1(5280,2485)
VSYS: C3.2 C4.2 C6.2 C7.2 CN1.1 Q3.1 Q3.2 Q3.3 Q4.5 R14.2 RAC.1 U4.1 | length 490
  Top Layer w10: RAC.1@4981.8,2871.8 4935,2825 4935,2731.61 4979.21,2687.4 C4.2 4987.67,2684.72 5082.72,2684.72 U4.1 ; 5489.99,2760 C7.2 R14.2
VUSB: Q1.5 R1.2 R12.1 TVS1.1 USB1.A4B9 USB1.B4A9
pads on no net: U1.2 U1.3 U1.8 U1.9 U1.10 U2.3 USB1. USB1.A6 USB1.A7 USB1.A8 USB1.B6 USB1.B7 USB1.B8

## Polygon pours and split planes (outlines as drawn)
VUSB on Top Layer "VUSB_L01_P008" (solid, pour order 8): 4770,2370 4902.29,2370 4917.25,2384.96 4967.25,2386.01 4966.48,2258.36 5050.23,2210 5160,2210 5160,2099.49 5125.3,2064.79 5125.3,1989.99 5287.59,1990.01 5287.42,2040 5315.19,2040 5314.66,1993.59 5287.16,1972.33 5129.82,1972.33 5097.18,1993.23 5097.18,2064.79 5025.51,2156.1 4845,2156.1 4770,2220
VSYS on Top Layer "VSYS_L01_P005" (solid, pour order 5): 4980,2915 4980,2831.72 5140,2760 5710,2760 5760,2810 5760,3005.28 5911.45,3004.75 5975.79,3050 5975.79,3827.51 5905.12,3905.12 4959.35,3905.12 4894.67,3803.53 4898.08,3650.51 5026.91,3649.85 5035,3803.53 5882.79,3803.53 5879.31,3070.51 5665,3070.51 5665,2850.51 5619.49,2805 5164.65,2805 5165.43,2850 5065,2850 5035,2874 5035,2915
NetC11_1 on Top Layer "NETC11_1_L01_P004" (solid, pour order 4): 5684.52,3160.07 5565,3159.41 5565,3000.84 5515.93,2964.06 5515.93,2897.91 5465.66,2897.91 5465.04,2964.06 5430.47,3010.47 5426.35,3353.24 5579.53,3353.24 5579.53,3301.75 5635,3280 5760,3280 5760,3089.84 5685.48,3090.08
NetC5_2 on Top Layer "NETC5_2_L01_P007" (solid, pour order 7): 4725,2600 4800,2600 4800,2550 4870.32,2465 4870.32,2380 4794.8,2380 4794.8,2465 4725,2550
NetC4_1 on Top Layer "NETC4_1_L01_P006" (solid, pour order 6): 4905,2910 4905,2835 4864.66,2835 4826.02,2773.88 4823.29,2616.05 4725,2614.11 4725,2720 4854.79,2910
VBAT on Top Layer "VBAT_L01_P000" (solid, pour order 0): 4570.4,3128.05 4758.69,3128.94 4818.51,3162.13 4817.88,3325 4905,3325 4905.27,3162.13 4927.98,3142.54 5104.67,3137.39 5105.45,3084.5 4905.42,3085.54 4905,3085.13 4905,3085.54 4905,2985.44 5205.29,2984.55 5205.29,2863.19 5082.54,2863.19 5082.54,2930 4838.24,2930 4736.94,2825 4675.17,2825 4674.78,2871.59 4728.92,2871.59 4770.74,2904.11 4769.09,2973.23 4819.23,2973.75 4855.82,3031.81 4855.82,3068.84 4758.69,3068.63 4570.4,3068.23
VBAT_IN on Top Layer "VBAT_IN_L01_P001" (solid, pour order 1): 5197.63,3381.89 5305,3382.73 5305,3456.64 5210.08,3456.64 5030,3325 5030,3175 5125,3175 5125,3325
NetC15_2 on Top Layer "NETC15_2_L01_P003" (solid, pour order 3): 5220,3350 5190.24,3140.79 5129.22,3141.13 5129.79,3080.33 5120.76,3071.3 4980.6,3068.89 4979.47,3005.11 5040.95,3004.78 5188.59,3080.09 5220,3080.33 5220,3015 5355,3015 5355,3025 5355,3350
NetCN2_2 on Top Layer "NETCN2_2_L01_P002" (solid, pour order 2): 5407.3,3645.17 5527.04,3645.17 5527.64,3765.5 5407.3,3764.91 5200,3575 5200,3495 5320,3495 5320,3575
GND on In1_GND "GND_L02_P011" (solid, remove dead copper, pour order 11): 4495,3920 6000,3920 6000,1685 4495,1685
GND on In2_GND "GND_L03_P012" (solid, remove dead copper, pour order 12): 4495,3920 6000,3920 6000,1685 4495,1685

## Text inside footprints (layer, text, board x,y; h text height)
CN2: Top Overlay "+" at 5368.54,3716.07 h39.37 r45; Top Overlay "-" at 5789.93,3724.99 h39.37 r270
LED1: Top Overlay "+" at 5759.57,2060.83 h23.62 r180
LED2: Top Overlay "+" at 5759.57,1920.83 h23.62 r180
LED3: Top Overlay "+" at 5759.57,1775.83 h23.62 r180